# Altium PCB EMG_Arm_ELCT-V3.0.PcbDoc (part 3 of 3)
Units mil, origin at the board's own origin, x right, y up, seen from the top; angles counter-clockwise.
Board outline 8303.83 x 7532.25 mil, 2 copper layers (Top Layer, Bottom Layer), stack 3.556 mil thick; 104 components, 76 nets, 393 pads, 162 vias.
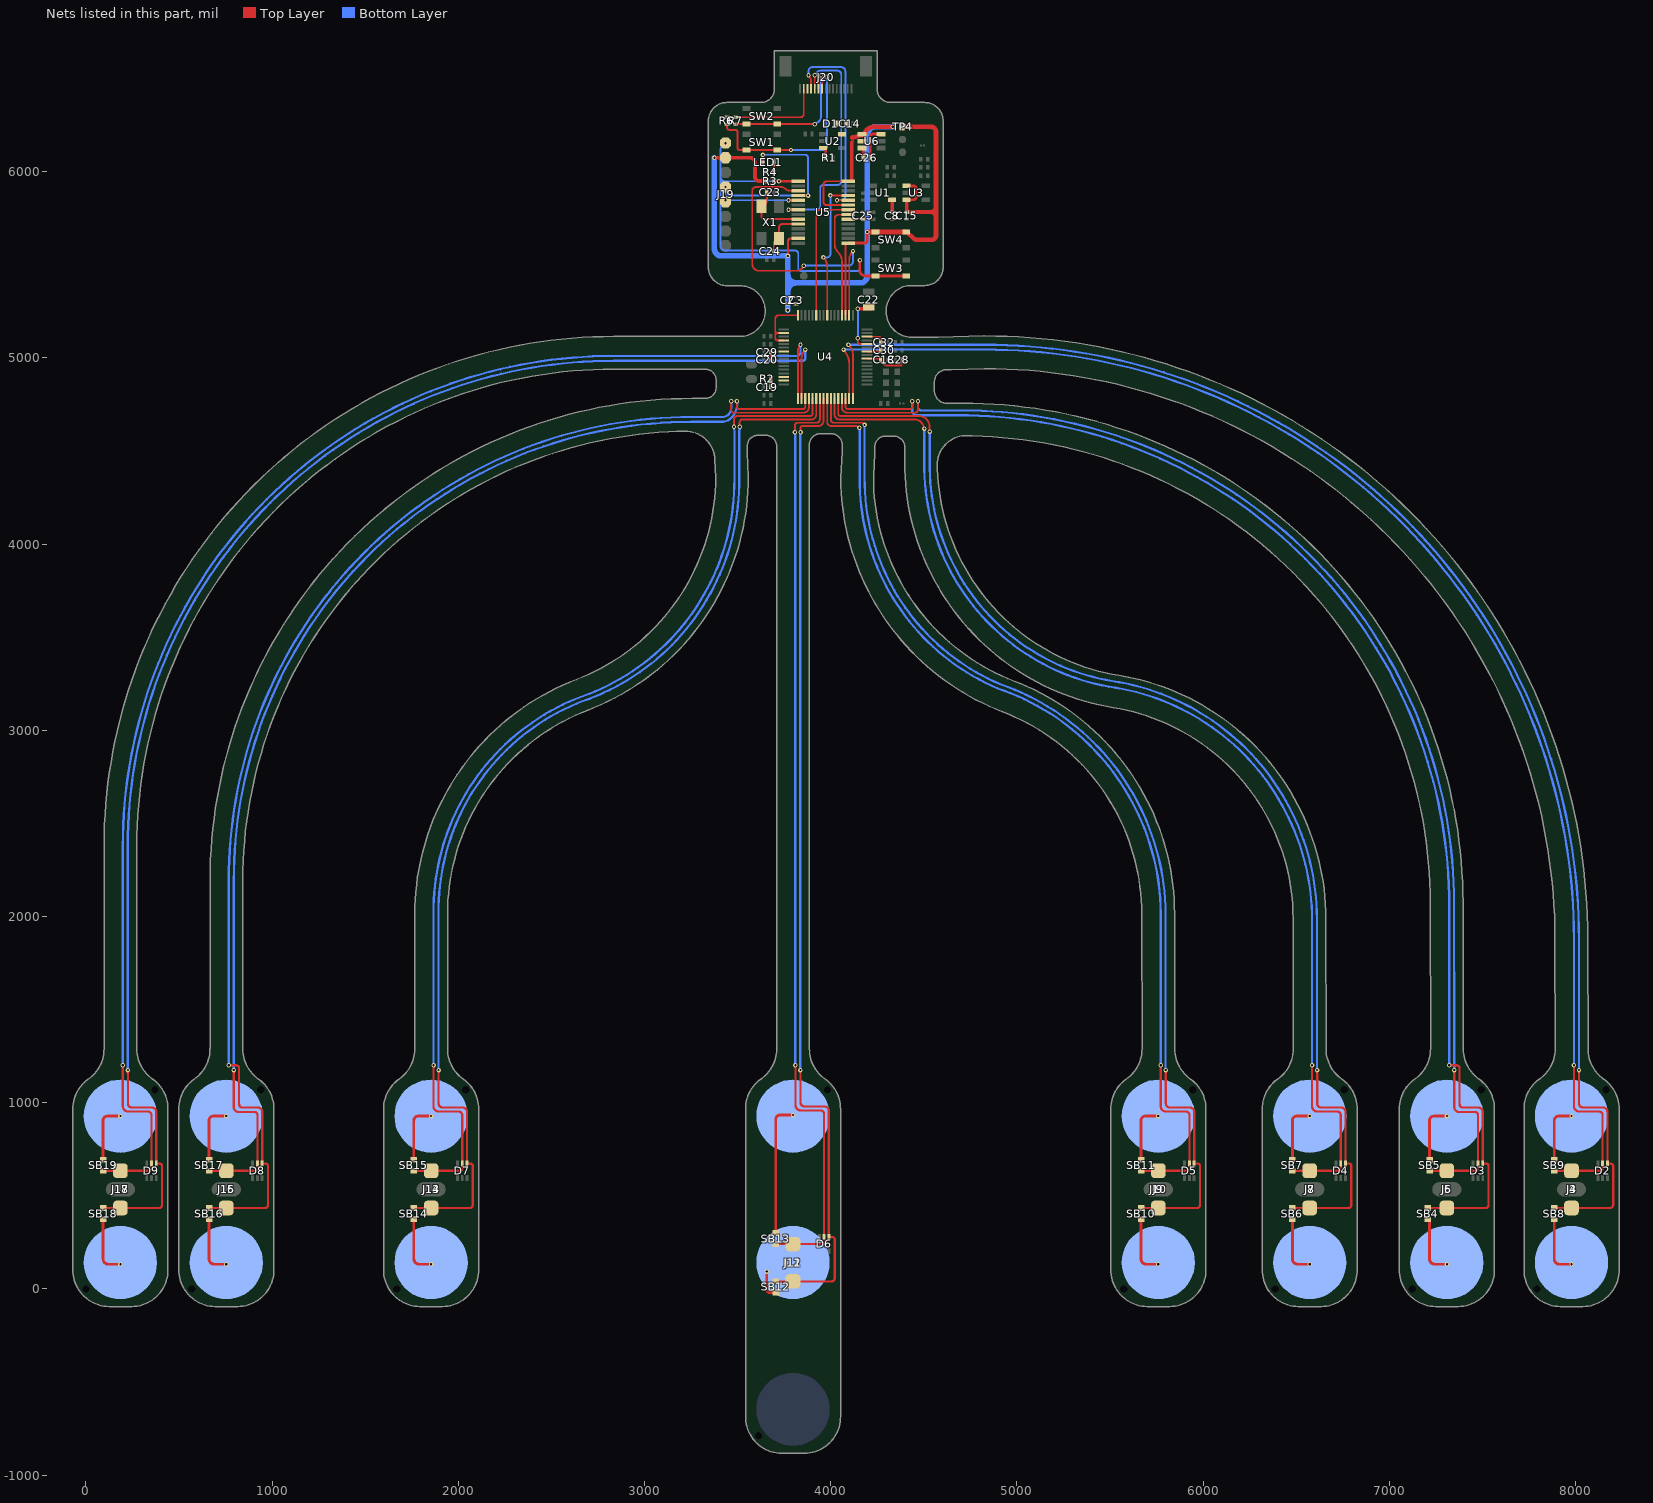
[diagram p2: the nets of this part, all layers, seen from the top]

## Via types
v1: diameter 23.62, hole 11.81, Top Layer to Bottom Layer, tented both sides, 162 vias

## Nets (pads, with @x,y where several pads share a name; then routed paths per layer and width w, separated by ;. In a path a pad name is that pad's centre, name@x,y a point inside that pad or via, vN(x,y) a via of type N, cw(c..) or ccw(c..) an arc to the next point about the centre after c; other vN are vias at no path point) (continued)
DVDD: C2.2 C3.2 C14.1 C15.1 J19.2 R3.2 SW4.1 SW4.2 TP4.1 U2.5 U3.1 U3.3 U4.35 U4.48 U4.50 U4.52 U5.13 U5.15 U5.23 U5.28 U6.4 U6.5 | length 6545.7
  Top Layer w10: U4.52@3748.03,5094.44 3713.2,5094.44 cw(c3713.2,5105.38) 3702.26,5105.38 3702.26,5122.85 ; U4.50@3748.03,5133.81 3713.22,5133.81 ; U4.48@3823.62,5229.08 3719.1,5229.08 ccw(c3719.1,5212.25) 3702.26,5212.25 3702.26,5144.77 ; U4.35@4079.2,5229.41 4079.2,5612.85 4083.06,5616.71 U5.15@4094.24,5616.71 ; U5.23@4094.24,5821.44 3977.11,5821.44 cw(c3977.11,5838.17) 3960.38,5838.17 3960.38,5929.41 cw(c3980.36,5929.41) 3980.36,5949.39 U5.28@4094.24,5949.39 U5.28@4113.38,5953.25 ; 4113.38,6157.85 4120.76,6165.05 ; 4182.47,5616.71 ccw(c4182.47,5630.62) 4185.19,5616.98 ; 3702.26,5122.85 cw(c3713.22,5122.85) 3713.22,5133.81 ; 3702.26,5122.85 3702.26,5144.77 ; 3702.26,5144.77 ccw(c3713.22,5144.77) 3713.22,5133.81
  Top Layer w12: v1@3769.52,5558.23 3770.49,5559.2 3770.49,5627.22 cw(c3785.57,5627.22) 3785.57,5642.3 U5.13@3826.52,5642.3
  Top Layer w15: U5.15@4094.24,5616.71 4182.47,5616.71 ; 4185.19,5616.98 ccw(c4182.47,5630.62) 4196.38,5630.57 ; 4196.38,5630.62 v1(4196.38,5676.34) ; U3.3@4407.71,5849.38 4441.77,5849.38 ccw(c4441.77,5866.9) 4459.29,5866.9 4459.29,5907.34 ccw(c4442.43,5907.34) 4442.43,5924.19 U3.1@4407.71,5924.19
  Top Layer w20: v1(3375.38,6075.53) J19.2@3435.38,6075.53 3566.42,6075.53 cw(c3566.42,6048.94) 3593.01,6048.94 3593.01,5972.47 ccw(c3615.43,5972.47) 3615.43,5950.05 R3.2@3653.59,5950.05 ; U5.28@4113.38,5953.25 4113.38,6157.85 ; C15.1@4407.71,5785.56 U3.3@4407.71,5849.38 ; C15.1@4408.96,5784.04 4531.73,5784.04 ; 4565.38,5745.79 4565.38,5750.38 ccw(c4531.73,5750.38) 4531.73,5784.04 ; 4565.38,5817.7 cw(c4531.73,5817.7) 4531.73,5784.04
  Top Layer w25: 4115.41,6183.59 4115.84,6183.7 4120.77,6185 4125.06,6186.13 4168.66,6197.63 4178.91,6200.34 cw(c4235.2,6183.59) 4235.2,6242.31 v1(4332.48,6242.31) ; v1(4196.38,5676.34) SW4.1@4240.11,5676.34 SW4.2@4405.47,5676.34 4409.62,5675.07 4447.37,5640.61 ccw(c4464.41,5659.38) 4464.41,5634.02 4467.19,5634.02 4541.13,5634.02 ccw(c4541.13,5658.27) 4565.38,5658.27 4565.38,5745.79 ; TP4.1@4385.38,6242.31 4536.12,6242.31 cw(c4536.12,6213.05) 4565.38,6213.05 4565.38,5750.38
  Bottom Layer w30: v1(3375.38,6075.53) 3375.38,5585.62 ccw(c3412.77,5585.62) 3412.77,5548.23 v1(3769.52,5548.23) ; v1@3769.81,5256.45 3769.81,5359.25 ; v1@3769.81,5548.23 3769.81,5446.85 ; v1(4332.48,6242.31) 4332.48,6242.21 4242.77,6242.21 ccw(c4242.77,6195.83) 4196.38,6195.83 v1(4196.38,5676.34) 4196.38,5441.74 cw(c4157.69,5441.74) 4157.69,5403.05 3813.61,5403.05 ; 3769.81,5359.25 cw(c3813.61,5359.25) 3813.61,5403.05 ; 3769.81,5359.25 3769.81,5446.85 ; 3769.81,5446.85 ccw(c3813.61,5446.85) 3813.61,5403.05
  other v1: 3769.38,5256.02
IN1N: D2.2 J3.3 SB9.2 U4.15 | length 7642.4
  Top Layer w10: v1@4070.32,5039.01 v1(4069.04,5044.74) 4083.09,5023.3 cw(c4000.55,4969.24) 4099.21,4969.24 U4.15@4099.21,4782.63
  Top Layer w12: SB9.2@7885.38,635 J3.3@7978.35,635 8131.63,635 ccw(c8131.63,648.75) 8145.38,648.75 D2.2@8145.38,673.19 8145.38,933.05 ccw(c8125.38,933.05) 8125.38,953.05 8019.38,953.05 cw(c8019.38,981) 7991.43,981 v1(7991.43,1201.19)
  Bottom Layer w12: v1@4069.04,5044.94 4825.14,5044.94 cw(c4827.28,1880.79) 7991.43,1882.94 v1(7991.43,1201.19) v1@7991.43,1195.89
IN1P: D2.1 J3.1 SB8.2 U4.16 | length 7960.8
  Top Layer w10: v1@4099.32,5065.69 v1(4094.73,5070.74) 4101.14,5063.8 cw(c4052.06,5018.43) 4118.9,5018.43 U4.16@4118.9,4782.63
  Top Layer w12: SB8.2@7885.38,435 J3.1@7978.35,435 8185.83,435 ccw(c8185.83,451.26) 8202.09,451.26 8202.09,660.77 ccw(c8189.68,660.77) 8189.68,673.19 D2.1@8170.97,673.19 8170.97,951.12 ccw(c8147.82,951.12) 8147.82,974.27 8039.99,974.27 cw(c8039.99,995.75) 8018.51,995.75 8018.51,1155.71 8018.38,1155.71 v1(8018.38,1175.36)
  Bottom Layer w12: v1@4094.73,5070.94 4825.14,5070.94 cw(c4827.08,1879.64) 8018.38,1881.58 v1(8018.38,1175.36)
IN2N: D3.2 J5.3 SB5.2 U4.13 | length 6757.9
  Top Layer w10: U4.13@4059.84,4782.63 4059.84,4735.24 ccw(c4089.18,4735.24) 4089.18,4705.9 4451.24,4705.9 ccw(c4451.24,4723) 4468.34,4723 v1(4468.34,4767.05)
  Top Layer w12: SB5.2@7215.9,635 7462.16,635 ccw(c7462.16,648.75) 7475.91,648.75 7475.91,934.57 ccw(c7460.09,934.57) 7460.09,950.38 7374.7,950.38 cw(c7374.7,976.17) 7348.91,976.17 v1(7348.91,1175.36)
  Bottom Layer w12: v1(4468.34,4767.05) 4468.34,4733.19 4471.08,4725.48 4476.61,4719.94 ccw(c4483.08,4733.19) 4483.08,4718.45 4697.61,4718.45 cw(c4699.81,2070.74) 7347.52,2072.94 7348.18,1336.76 7348.18,1177.12 ccw(c7350.66,1177.12) v1(7348.91,1175.36)
IN2P: D3.1 J5.1 SB4.2 U4.14 | length 7011.9
  Top Layer w10: U4.14@4079.53,4782.63 4079.53,4738.31 ccw(c4092.39,4738.31) 4092.39,4725.45 4426.16,4725.45 ccw(c4426.16,4737.05) 4437.76,4737.05 v1@4437.76,4767.05
  Top Layer w12: SB4.2@7215.91,435 7516.35,435 ccw(c7516.35,451.26) 7532.62,451.26 7532.62,660.77 ccw(c7520.2,660.77) 7520.2,673.19 D3.1@7501.5,673.19 7501.5,951.12 ccw(c7478.34,951.12) 7478.34,974.27 7395.67,974.27 cw(c7395.67,992.56) 7377.38,992.56 7377.38,1185.05 ccw(c7361.24,1185.05) 7361.24,1201.19 v1(7321.96,1201.19)
  Bottom Layer w12: v1(4437.71,4767.05) 4437.71,4716.09 ccw(c4461.35,4716.09) 4461.35,4692.45 4684.04,4692.45 4684.58,4692.45 cw(c4686.51,2057.02) 7321.93,2059.36 v1@7321.93,1201.22
IN3N: D4.2 J7.3 SB7.2 U4.11 | length 6034.7
  Top Layer w10: U4.11@4020.47,4782.63 4020.47,4696.32 ccw(c4047.14,4696.32) 4047.14,4669.66 4450.56,4669.66 cw(c4450.56,4620.56) 4496.78,4637.13 v1(4502.71,4620.56)
  Top Layer w12: SB7.2@6479.16,634.99 6725.41,634.99 ccw(c6725.41,648.74) 6739.16,648.74 6739.16,933.04 ccw(c6719.16,933.04) 6719.16,953.04 6613.16,953.04 cw(c6613.16,981) 6585.21,981 v1(6585.21,1201.18)
  Bottom Layer w12: 4502.71,4437.86 ccw(c5706.43,4419.62) 5492.76,3234.88 cw(c5323.01,1987.11) 6271.82,2815.05 cw(c5314.86,1980) 6584.93,1979.18 6584.93,1201.46 v1(6585.21,1201.18) ; 4502.71,4437.86 v1(4502.71,4620.56)
IN3P: D4.1 J7.1 SB6.2 U4.12 | length 6327.3
  Top Layer w10: U4.12@4040.16,4782.63 4040.16,4701.22 ccw(c4053.09,4701.22) 4047.83,4689.41 ccw(c4053.09,4701.22) 4053.09,4688.29 4472.55,4688.29 cw(c4472.55,4629.62) 4531.22,4629.62 v1(4531.22,4604.56)
  Top Layer w12: SB6.2@6479.16,434.99 6779.6,434.99 ccw(c6779.6,451.26) 6795.87,451.26 6795.87,660.77 ccw(c6783.45,660.77) 6783.45,673.18 D4.1@6764.75,673.18 6764.75,951.11 ccw(c6741.59,951.11) 6741.59,974.27 6633.76,974.27 cw(c6633.76,995.75) 6612.28,995.75 6612.28,1155.71 6612.16,1155.71 v1(6612.16,1175.36)
  Bottom Layer w12: v1(4531.22,4604.56) 4531.22,4442.9 4531.2,4441.17 ccw(c5713.01,4425.65) 4805.87,3668 ccw(c5700.51,4415.2) 5510.86,3265.1 5510.95,3265.09 cw(c5317.55,1986.08) 6611.09,1988.33 6611.26,1339.69 6611.26,1177.52 ccw(c6614.32,1177.52) v1(6612.16,1175.36)
IN4N: D5.2 J9.3 SB11.2 U4.9 | length 5378.4
  Top Layer w10: U4.9@3981.1,4782.63 3981.1,4655.76 ccw(c4002.22,4655.76) 4002.22,4634.65 4135.97,4634.65 cw(c4135.97,4625.56) 4140.37,4633.51 v1(4154.13,4625.56)
  Top Layer w12: SB11.2@5666.45,635 J9.3@5759.41,635 5912.69,635 ccw(c5912.69,648.75) 5926.45,648.75 D5.2@5926.45,673.19 5926.45,933.05 ccw(c5906.45,933.05) 5906.45,953.05 5800.45,953.05 cw(c5800.45,981) 5772.5,981 v1(5772.5,1201.19)
  Bottom Layer w12: v1@4155.3,4625.56 4155.3,4353.38 ccw(c5373.93,4346.65) 4895.83,3225.7 cw(c4484.74,2005.3) 5772.43,2019.89 5772.43,1201.25 v1(5772.5,1201.19)
IN4P: D5.1 J9.1 SB10.2 U4.10 | length 5671
  Top Layer w10: U4.10@4000.79,4782.63 4000.79,4667.33 ccw(c4016.26,4667.33) 4016.26,4651.86 4167.08,4651.86 cw(c4167.08,4640.56) 4174.36,4649.21 4182.91,4642.1 v1@4184.75,4640.56
  Top Layer w12: SB10.2@5666.45,435 J9.1@5759.41,435 5966.89,435 ccw(c5966.89,451.26) 5983.16,451.26 5983.16,660.77 ccw(c5970.74,660.77) 5970.74,673.19 D5.1@5952.04,673.19 5952.04,951.12 ccw(c5928.88,951.12) 5928.88,974.27 5821.05,974.27 cw(c5821.05,995.75) 5799.57,995.75 5799.57,1155.71 5799.45,1155.71 v1(5799.45,1175.36)
  Bottom Layer w12: v1(4181.64,4640.56) 4181.64,4354.86 ccw(c5377.34,4348.61) 4914.27,3246.2 cw(c4482.4,2003.02) 5798.38,2017.44 5798.38,1177.93 ccw(c5802.01,1177.93) v1(5799.45,1175.36)
IN5N: D6.2 J11.3 SB13.2 U4.7 | length 5134.1
  Top Layer w10: v1(3807.38,4601.05) 3807.38,4637.62 cw(c3821.62,4637.62) 3821.62,4651.86 3924.15,4651.86 ccw(c3924.15,4669.45) 3941.73,4669.45 U4.7@3941.73,4782.63
  Top Layer w12: SB13.2@3704.28,240.8 J11.3@3797.24,240.8 3950.53,240.8 ccw(c3950.53,254.55) 3964.28,254.55 3964.28,938.85 ccw(c3944.28,938.85) 3944.28,958.85 3838.28,958.85 cw(c3838.28,986.8) 3810.33,986.8 v1(3810.33,1201.19)
  Bottom Layer w12: v1(3807.38,4601.05) cw(c3807.38,4598.83) 3809.6,4598.83 3809.6,4561.31 3809.93,1355.05 ; 3809.93,1437.83 3809.93,1355.05 ; v1(3810.33,1201.19) cw(c3811.29,1202.15) 3809.93,1202.15 3809.93,1355.05
IN5P: D6.1 J11.1 SB12.2 U4.8 | length 5402
  Top Layer w10: v1@3838,4601.05 3837.38,4601.05 3837.38,4623.05 cw(c3848.98,4623.05) 3848.98,4634.65 3932.59,4634.65 ccw(c3932.59,4663.48) 3961.42,4663.48 U4.8@3961.42,4782.63
  Top Layer w12: SB12.2@3704.28,40.8 J11.1@3797.24,40.8 4004.72,40.8 ccw(c4004.72,57.06) 4020.99,57.06 4020.99,266.57 ccw(c4008.57,266.57) 4008.57,278.98 3989.87,278.98 3989.87,956.91 ccw(c3966.71,956.91) 3966.71,980.07 3858.88,980.07 cw(c3858.88,1001.55) 3837.4,1001.55 v1@3837.4,1175.37
  Bottom Layer w12: 3836.55,1419.54 3836.55,1336.76 ; v1(3837.28,1175.37) cw(c3839.04,1177.12) 3836.55,1177.12 3836.55,1336.76 ; v1@3838,4601.05 ccw(c3838,4599.26) 3836.22,4599.26 3836.22,4561.31 3836.55,1336.76
  other v1: 3838,4600.56
IN6N: D7.2 J13.3 SB15.2 U4.5 | length 5636.1
  Top Layer w10: v1(3480.18,4630.56) 3480.19,4662.37 3480.19,4670.42 cw(c3498.06,4670.42) 3498.06,4688.29 3889.44,4688.29 ccw(c3889.44,4701.22) 3894.7,4689.41 ccw(c3889.44,4701.22) 3902.36,4701.22 U4.5@3902.36,4782.63
  Top Layer w12: SB15.2@1760.8,635 J13.3@1853.76,635 2007.05,635 ccw(c2007.05,648.75) 2020.8,648.75 D7.2@2020.8,673.19 2020.8,933.05 ccw(c2000.8,933.05) 2000.8,953.05 1894.8,953.05 cw(c1894.8,981) 1866.85,981 v1(1866.85,1201.19)
  Bottom Layer w12: v1(1866.85,1201.19) 1866.91,1201.25 1866.91,2014.97 cw(c3097,2030.82) 2700.07,3195.22 ccw(c2251.82,4341.31) 3482.43,4348.62 3482.43,4594.75 ccw(c3470.43,4594.75) 3482.4,4595.5 v1(3480.18,4630.56)
IN6P: D7.1 J13.1 SB14.2 U4.6 | length 5902.2
  Top Layer w10: v1(3510.8,4630.59) 3510.76,4654.02 cw(c3526.39,4654.04) 3526.39,4669.66 3895.39,4669.66 ccw(c3895.39,4696.32) 3922.05,4696.32 U4.6@3922.05,4782.63
  Top Layer w12: SB14.2@1760.8,435 J13.1@1853.76,435 2061.24,435 ccw(c2061.24,451.26) 2077.51,451.26 2077.51,660.77 ccw(c2065.09,660.77) 2065.09,673.19 D7.1@2046.39,673.19 2046.39,951.12 ccw(c2023.23,951.12) 2023.23,974.27 1915.4,974.27 cw(c1915.4,995.75) 1893.92,995.75 1893.92,1155.71 1893.8,1155.71 v1(1893.8,1175.36)
  Bottom Layer w12: v1(1893.8,1175.36) cw(c1895.55,1177.12) 1893.07,1177.12 1893.07,1336.76 1893.82,2015.83 cw(c3098.17,2031.47) 2705.5,3170.11 ; 2705.5,3170.11 ccw(c2257.62,4337.95) 3508.28,4354.96 3508.28,4594.78 cw(c3520.28,4594.78) 3508.31,4595.63 v1(3510.8,4630.59)
IN7N: D8.2 J15.3 SB17.2 U4.3 | length 6560
  Top Layer w10: v1(3495.81,4767.05) 3495.81,4738.52 ccw(c3508.89,4738.52) 3508.89,4725.45 3850.13,4725.45 ccw(c3850.13,4738.31) 3862.99,4738.31 U4.3@3862.99,4782.63
  Top Layer w12: SB17.2@661.01,635 907.26,635 ccw(c907.26,648.75) 921.01,648.75 921.01,934.57 ccw(c905.2,934.57) 905.2,950.38 819.8,950.38 cw(c819.8,976.17) 794.01,976.17 v1(794.01,1175.36)
  Bottom Layer w12: v1(794.01,1175.36) cw(c795.77,1177.12) 793.28,1177.12 793.28,1336.76 793.91,2195.32 cw(c3252.32,2198.53) 3249.14,4656.94 3412.93,4656.94 ccw(c3413.08,4732.54) 3470.98,4683.92 ccw(c3382.98,4757.79) 3497.84,4760.44 ccw(c3485.85,4760.13) 3496.63,4765.39 v1(3495.81,4767.05)
IN7P: D8.1 J15.1 SB16.2 U4.4 | length 6969.6
  Top Layer w10: v1(3465.19,4767.05) 3465.19,4722 ccw(c3481.29,4722) 3481.29,4705.9 3853.34,4705.9 ccw(c3853.34,4735.24) 3882.68,4735.24 U4.4@3882.68,4782.63
  Top Layer w12: SB16.2@661.01,435 961.46,435 ccw(c961.46,451.26) 977.72,451.26 977.72,660.77 ccw(c965.31,660.77) 965.31,673.19 D8.1@946.6,673.19 946.6,951.12 ccw(c923.45,951.12) 923.45,974.27 840.77,974.27 cw(c840.77,992.56) 822.49,992.56 822.49,1185.05 ccw(c806.35,1185.05) 806.35,1201.19 v1(767.06,1201.19)
  Bottom Layer w12: v1(767.06,1201.19) 766.91,1201.35 766.91,2194.35 cw(c3252.81,2197.03) 3250.14,4682.94 3418.57,4682.94 ccw(c3418.57,4729.56) 3465.19,4729.56 v1(3465.19,4767.05)
IN8N: D9.2 J17.3 SB19.2 U4.1 | length 7616.3
  Top Layer w10: U4.1@3823.62,4782.63 3823.62,5036.52 cw(c3872.01,5036.52) v1(3837.8,5070.74)
  Top Layer w12: SB19.2@92.03,635 338.29,635 ccw(c338.29,648.75) 352.04,648.75 352.04,933.05 ccw(c332.04,933.05) 332.04,953.05 226.04,953.05 cw(c226.04,981) 198.09,981 v1(198.09,1201.19)
  Bottom Layer w12: v1(198.09,1201.19) 197.93,1201.35 197.93,2378.94 cw(c2832.03,2376.83) 2834.14,5010.94 3818.27,5010.94 ccw(c3818.27,5030.05) 3837.38,5030.05 3837.38,5070.74 v1(3837.8,5070.74)
IN8P: D9.1 J17.1 SB18.2 U4.2 | length 7859.9
  Top Layer w10: U4.2@3843.31,4782.63 3843.31,4996.04 cw(c3912.18,4996.04) v1(3863.48,5044.74)
  Top Layer w12: SB18.2@92.03,435 392.48,435 ccw(c392.48,451.26) 408.75,451.26 408.75,660.77 ccw(c396.33,660.77) 396.33,673.19 D9.1@377.63,673.19 377.63,951.12 ccw(c354.47,951.12) 354.47,974.27 246.64,974.27 cw(c246.64,995.75) 225.16,995.75 225.16,1155.71 225.04,1155.71 v1(225.04,1175.36)
  Bottom Layer w12: v1(225.04,1175.36) cw(c226.79,1177.12) 224.31,1177.12 224.31,2379.72 cw(c2831.83,2377.41) 2834.14,4984.94 3848.27,4984.94 ccw(c3848.27,5000.15) 3863.48,5000.15 v1(3863.48,5044.74)
MCLR: J19.1 R3.1 SW3.3 SW3.4 U5.1 | length 2306.6
  Top Layer w15: R3.1@3698.21,5949.39 v1(3721.64,5949.39) U5.1@3826.52,5949.39 ; v1(4156.35,5525.08) ccw(c4156.35,5524.11) 4155.38,5524.11 4155.38,5473.05 ccw(c4187.7,5473.05) 4187.7,5440.73 SW3.3@4240.5,5440.73 SW3.4@4405.86,5440.73
  Bottom Layer w10: 3410.1,5949.39 v1@3721.93,5949.39 ; v1(3435.38,6153.05) 3417.48,6137.72 ccw(c3435.38,6116.82) 3407.87,6116.82 3407.87,5972.62 ; v1(4156.35,5525.08) 4156.35,5482.32 cw(c4141.88,5482.32) 4141.88,5467.84 3838.92,5467.84 cw(c3838.92,5481.38) 3825.38,5481.38 3825.38,5558.05 ccw(c3805.38,5558.05) 3805.38,5578.05 3429.84,5578.05 cw(c3429.84,5600.02) 3407.87,5600.02 3407.87,5926.15 ; 3407.87,5926.15 cw(c3431.1,5926.15) 3431.1,5949.39 cw(c3431.1,5972.62) 3407.87,5972.62 ; 3407.87,5926.15 3407.87,5949.39 3407.87,5972.62
MISO: U4.43 U5.22 | length 730.5
  Top Layer w10: U4.43@3922.05,5229.08 3922.05,5775.5 cw(c3942.6,5775.5) 3942.6,5796.05 4094.24,5796.05 U5.22@4094.24,5795.85
MOSI: U4.34 U5.3 | length 1650.4
  Top Layer w10: 3819.47,5468.09 3616.51,5468.09 cw(c3616.51,5506.22) 3578.38,5506.22 3578.38,5898.05 cw(c3598.38,5898.05) 3598.38,5918.05 3732.71,5918.05 cw(c3732.71,5884.18) 3756.64,5908.15 ccw(c3780.61,5932.08) 3780.61,5898.21 U5.3@3826.52,5898.21 ; 3819.52,5468.09 ccw(c3819.52,5499.58) 3845.75,5482.15 v1(3854.73,5495.67) ; U4.34@4099.21,5229.08 4099.21,5525.08 cw(c4168.44,5525.08) v1(4119.49,5574.02)
  Bottom Layer w10: v1(3854.73,5495.67) 4096.34,5495.67 ccw(c4096.34,5518.82) 4119.49,5518.82 v1(4119.49,5574.02)
NetC8_1: C8.1 U1.4 | length 63.9
  Top Layer w20: C8.1@4330.09,5785.52 U1.4@4330.09,5849.38
NetC18_1: C18.1 C28.2 U4.24 | length 227.7
  Top Layer w10: U4.24@4194.63,4996.15 C18.1@4268.38,4996.15 ; C18.1@4268.38,4989.15 4272.38,4981.65 4281.63,4970.19 ccw(c4305.13,4989.15) 4305.13,4958.96 4372.85,4958.96 ccw(c4372.85,4968.82) 4379.02,4961.12 4380.54,4962.65 ccw(c4372.85,4968.82) 4382.71,4968.82 C28.2@4382.71,4989.38
NetC19_2: C19.2 R2.2 U4.62 U4.63 | length 44.9
  Top Layer w15: C19.2@3678.7,4843.9 R2.2@3678.71,4888.78
NetC20_2: C20.2 C29.2 U4.55 | length 44.9
  Top Layer w12: C20.2@3678.71,4984.5 C29.2@3678.71,5029.38
NetC22_2: C22.2 U4.28 | length 307.3
  Top Layer w10: v1(4145.43,5105.4) 4145.2,5105.4 4145.2,5086.74 ccw(c4157.2,5086.74) 4157.2,5074.75 U4.28@4194.49,5074.75
  Top Layer w20: v1(4145.43,5264.21) C22.2@4218.92,5264.21
  Bottom Layer w10: v1(4145.43,5105.4) v1(4145.43,5264.21)
NetC23_2: C23.2 U5.9 X1.1 | length 355
  Top Layer w10: C23.2@3656.88,5889.35 3656.88,5843.28 cw(c3628.14,5843.28) X1.1@3628.14,5814.54 3628.14,5762.18 ccw(c3644.76,5762.18) 3644.76,5745.57 U5.9@3830.14,5745.57
NetC24_2: C24.2 U5.10 X1.3 | length 259.4
  Top Layer w10: C24.2@3693.88,5573.05 3693.88,5612.58 cw(c3722.62,5612.58) X1.3@3722.62,5641.32 3722.62,5702.86 cw(c3738.84,5702.86) 3738.84,5719.07 U5.10@3826.52,5719.07
NetC25_2: C25.2 U5.20 | length 81.7
  Top Layer w10: U5.20@4094.24,5744.66 4174.43,5744.66 ccw(c4174.43,5745.61) C25.2@4175.38,5745.61
NetC26_1: C26.1 U6.3 | length 169.2
  Top Layer w15: C26.1@4211.97,6079.61 4211.97,6190.25 cw(c4224.17,6190.25) 4224.17,6202.45 U6.3@4263.54,6202.45
NetC26_2: C26.2 U6.6 | length 47.7
  Top Layer w15: U6.6@4167.39,6127.65 U6.6@4174.26,6127.65 ; C26.2@4174.47,6079.61 U6.6@4174.47,6120.45
NetC30_2: C30.2 U4.26 | length 73.9
  Top Layer w10: U4.26@4194.49,5035.38 C30.2@4268.39,5035.38
NetC32_2: C32.2 U4.30 | length 99.7
  Top Layer w10: U4.30@4194.49,5114.12 4256.98,5114.12 cw(c4256.98,5102.71) 4268.39,5102.71 C32.2@4268.39,5083.4
NetJ4_1: J4.1 SB9.1 | length 316.2
  Top Layer w15: SB9.1@7885.38,695 7885.38,905.06 cw(c7908.52,905.06) 7908.52,928.2 v1(7978.34,928.2)
NetJ4_2: J4.2 SB8.1 | length 322.8
  Top Layer w15: SB8.1@7885.38,375 7885.38,161.21 ccw(c7913.55,161.21) 7913.55,133.05 v1(7978.35,133.05)
NetJ6_1: J6.1 SB5.1 | length 316.2
  Top Layer w15: SB5.1@7215.9,695 7215.91,905.06 cw(c7239.05,905.06) 7239.05,928.2 v1(7308.87,928.2)
NetJ6_2: J6.2 SB4.1 | length 322.8
  Top Layer w15: SB4.1@7215.91,375 7215.91,161.22 ccw(c7244.07,161.22) 7244.07,133.05 v1(7308.87,133.05)
NetJ8_1: J8.1 SB7.1 | length 316.2
  Top Layer w15: SB7.1@6479.16,694.99 6479.16,905.05 cw(c6502.3,905.05) 6502.3,928.19 v1(6572.12,928.19)
NetJ8_2: J8.2 SB6.1 | length 322.8
  Top Layer w15: SB6.1@6479.16,374.99 6479.16,161.21 ccw(c6507.32,161.21) 6507.32,133.04 v1(6572.12,133.04)
NetJ10_1: J10.1 SB11.1 | length 316.2
  Top Layer w15: SB11.1@5666.45,695 5666.45,905.06 cw(c5689.58,905.06) 5689.58,928.2 v1(5759.41,928.2)
NetJ10_2: J10.2 SB10.1 | length 322.8
  Top Layer w15: SB10.1@5666.45,375 5666.45,161.21 ccw(c5694.61,161.21) 5694.61,133.05 v1(5759.41,133.05)
NetJ12_1: J12.1 SB13.1 | length 716.2
  Top Layer w15: SB13.1@3704.28,300.8 3704.28,910.85 cw(c3727.42,910.85) 3727.42,933.99 v1(3797.24,933.99)
NetJ12_2: J12.2 SB12.1 | length 153.4
  Top Layer w15: v1(3656.36,93.05) 3656.36,-3.43 ccw(c3672.13,-3.43) 3672.13,-19.2 SB12.1@3704.28,-19.2
NetJ14_1: J14.1 SB15.1 | length 316.2
  Top Layer w15: SB15.1@1760.8,695 1760.8,905.06 cw(c1783.94,905.06) 1783.94,928.2 v1(1853.76,928.2)
NetJ14_2: J14.2 SB14.1 | length 322.8
  Top Layer w15: SB14.1@1760.8,375 1760.8,161.21 ccw(c1788.96,161.21) 1788.96,133.05 v1(1853.76,133.05)
NetJ16_1: J16.1 SB17.1 | length 316.2
  Top Layer w15: SB17.1@661.01,695 661.01,905.06 cw(c684.15,905.06) 684.15,928.2 v1(753.98,928.2)
NetJ16_2: J16.2 SB16.1 | length 322.8
  Top Layer w15: SB16.1@661.01,375 661.01,161.21 ccw(c689.18,161.21) 689.18,133.05 v1(753.98,133.05)
NetJ18_1: J18.1 SB19.1 | length 316.2
  Top Layer w15: SB19.1@92.03,695 92.04,905.06 cw(c115.18,905.06) 115.18,928.2 v1(185,928.2)
NetJ18_2: J18.2 SB18.1 | length 322.8
  Top Layer w15: SB18.1@92.03,375 92.04,161.21 ccw(c120.2,161.21) 120.2,133.05 v1(185,133.05)
NetLED1_2: LED1.2 R4.2 | length 55.1
  Top Layer w16: R4.2@3693.88,5996.68 LED1.2@3693.88,6051.79
NetR1_2: R1.2 U2.3 | length 57.9
  Top Layer w15: U2.3@3958.7,6127.71 3965.58,6127.71 3972.78,6120.5 R1.2@3972.78,6079.67
PGC: J19.5 U5.5 | length 391.1
  Top Layer w15: v1@3773.38,5847.03 U5.5@3826.52,5847.03
  Bottom Layer w10: v1(3435.38,5847.23) v1(3773.38,5847.23)
PGD: J19.4 LED1.1 U5.4 | length 1032.9
  Top Layer w15: LED1.1@3634.83,6066.79 LED1.1@3635.1,6067.07 ; LED1.1@3635.1,6052.07 v1@3635.1,6090.25 ; U5.4@3820.38,5873.05 3821.06,5872.37 3878.33,5872.37 v1(3878.57,5872.13)
  Bottom Layer w10: v1(3435.38,5918.25) 3435.99,5918.25 3435.99,5888.05 ccw(c3451.91,5888.05) 3451.91,5872.13 3773.38,5872.13 v1(3878.57,5872.13) 3878.57,6073.09 ccw(c3860.16,6073.09) 3860.16,6091.51 v1@3636.83,6091.51
  other v1: 3635.38,6090.53
RESET: U4.36 U5.21 | length 615.1
  Top Layer w10: U4.36@4059.84,5229.08 4059.84,5518.87 ccw(c3992.64,5518.87) 4040.16,5566.39 cw(c4085.52,5611.76) 4021.37,5611.76 4021.37,5748.75 cw(c4041.67,5748.75) 4041.67,5769.05 4093.04,5769.05 ccw(c4093.04,5770.25) U5.21@4094.24,5770.25
RXD: J20.4 U5.24 | length 1110.4
  Top Layer w10: v1(3880.61,6518.2) cw(c3847.08,6484.66) 3894.5,6484.66 J20.4@3894.5,6445.36 ; v1(4033.54,5847.03) U5.24@4094.24,5847.03
  Bottom Layer w10: v1(3880.61,6518.2) 3880.61,6540.58 cw(c3902.09,6540.58) 3902.09,6562.05 4055.61,6562.05 cw(c4055.61,6539.27) 4078.39,6539.27 4078.39,5868.81 cw(c4056.61,5868.81) 4056.61,5847.03 v1(4033.54,5847.03)
SCLK: U4.40 U5.25 | length 775.7
  Top Layer w10: v1(3960.38,5540.3) 3960.38,5539.79 cw(c3910.35,5489.76) 3981.1,5489.79 U4.40@3981.1,5229.08 ; v1(3998.38,5873.05) ccw(c3999.43,5874.1) 3999.43,5872.62 U5.25@4094.24,5872.62
  Bottom Layer w10: v1(3960.38,5540.3) 3970.84,5539.79 3979.12,5539.79 ccw(c3979.12,5559.05) 3998.38,5559.05 v1(3998.38,5873.05)
SW1: J20.7 R6.1 SW1.1 SW1.2 | length 1123.3
  Top Layer w10: R6.1@3442.67,6256.02 3442.67,6237.78 ccw(c3455.45,6237.78) 3455.45,6225 3487.13,6225 cw(c3487.13,6212.77) 3499.36,6212.77 3499.36,6128.52 ccw(c3510.93,6128.52) 3510.93,6116.95 SW1.1@3713.06,6116.95 v1(3786.33,6116.95) ; J20.7@3953.56,6445.36 3953.56,6474.89 cw(c3978.49,6474.89) 3960.85,6492.49 ; 3960.87,6492.51 3978.49,6510.14 v1(3981.3,6510.14)
  Bottom Layer w10: v1(3786.33,6116.95) 3960.98,6116.95 ccw(c3960.98,6136.33) 3980.36,6136.33 3980.36,6509.2 cw(c3981.3,6509.2) v1(3981.3,6510.14)
SW2: J20.6 R7.1 SW2.1 SW2.2 | length 778.4
  Top Layer w10: R7.1@3490.38,6256.02 3547.7,6256.02 SW2.2@3547.7,6255.73 SW2.1@3713.06,6255.73 v1(3914.18,6255.73) ; J20.6@3933.87,6445.36 3933.87,6484.66 cw(c3981.3,6484.66) v1(3947.76,6518.2)
  Bottom Layer w10: v1(3914.18,6255.73) 3932.25,6267.27 ccw(c3914.18,6295.57) 3947.76,6295.57 v1(3947.76,6518.2)
TXD: J20.5 U5.7 | length 1276.7
  Top Layer w10: v1@3773.38,5795.85 v1(3773.38,5796.05) ; J20.5@3914.18,6445.36 v1(3914.18,6518.2)
  Top Layer w15: v1@3773.38,5795.85 U5.7@3826.52,5795.85
  Bottom Layer w10: v1(3773.38,5796.05) cw(c3774.38,5796.05) 3774.38,5797.05 3924.56,5797.05 ; v1(3914.18,6518.2) 3925.14,6532.99 cw(c3945.11,6518.2) 3945.11,6543.05 4035.38,6543.05 cw(c4035.38,6521.83) 4056.61,6521.83 4056.61,5949.39 cw(c4036.63,5949.39) 4036.63,5929.41 3960.38,5929.41 ccw(c3960.38,5912.41) 3943.38,5912.41 3943.38,5811.61 cw(c3933.38,5811.61) 3941.6,5805.9 cw(c3924.6,5817.79) 3924.6,5797.05
VBATT: D1.1 J20.3
VCC_3V3: J20.2 R6.2 R7.2 | length 557.4
  Top Layer w10: R6.2@3442.67,6293.02 R7.2@3490.38,6293.02 3837.91,6293.02 ccw(c3837.91,6310.25) 3855.13,6310.25 J20.2@3855.13,6445.36
pads on no net: D2.4 D2.5 D2.6 D3.4 D3.5 D3.6 D4.4 D4.5 D4.6 D5.4 D5.5 D5.6 D6.4 D6.5 D6.6 D7.4 D7.5 D7.6 D8.4 D8.5 D8.6 D9.4 D9.5 D9.6 J20.8 J20.9 J20.10 J20.11 J20.12 J20.13 J20.14 J20.15 U2.4 U3.4 U4.27 U4.29 U4.38 U4.42 U4.44 U4.45 U4.46 U5.14 U5.16 U5.17 U5.18

## Polygon pours and split planes (outlines as drawn)
AGND on Top Layer "AGND_L01_P012" (hatched 45Degree grid 20 track 8, remove dead copper, pour order 12): 3739,6415.83 3739,6616.62 4207.49,6616.62 4207.49,6415.83 4133.26,6415.83 4133.26,6546.43 3837.22,6546.43 3837.22,6415.83
BIAS_DRV_ELCT on Top Layer "BIAS_DRV_ELCT_L01_P002" (solid, pour order 2): 4325.39,4905.83 ccw(c4333.98,4905.87) 4334.01,4897.28 4371.58,4897.28 4371.58,4789.69 4341.58,4789.69 cw(c4341.58,4801.79) 4329.47,4801.79 4329.47,4885.13 ccw(c4320.86,4885.13) 4320.86,4893.74 4281.58,4893.74 4281.58,4942.28 4325.39,4942.28
AGND on Top Layer "AGND_L01_P009" (hatched 45Degree grid 20 track 8, remove dead copper, pour order 9): 4447.69,5710.22 cw(c4447.69,5699.01) 4458.89,5699.01 4458.89,5678.69 ccw(c4475.01,5678.69) 4475.01,5662.57 4526.6,5662.57 ccw(c4526.6,5676.34) 4540.38,5676.34 4540.38,5738.05 ccw(c4517.04,5738.05) 4517.04,5761.4 4230.91,5761.4 4196.38,5761.4 4196.38,5727.93 4057.82,5727.93 4057.82,5710.22
AGND on Top Layer "AGND_L01_P007" (hatched 45Degree grid 20 track 8, remove dead copper, pour order 7): 3484.2,6007.87 cw(c3503.12,6007.87) 3503.12,6026.79 3537.7,6026.79 cw(c3537.7,6007.11) 3557.38,6007.11 3557.38,5463.13 cw(c3537.3,5463.13) 3537.3,5443.05 3505.38,5443.05 cw(c3505.38,5464.23) 3484.2,5464.23
AVSS on Top Layer "AVSS_L01_P004" (hatched 45Degree grid 20 track 8, remove dead copper, pour order 4): 4226.75,5334.21 cw(c4226.75,5313.68) 4247.28,5313.68 4247.28,5213.72 cw(c4233.78,5213.65) 4233.84,5200.15 4165.55,5200.15 4165.55,5147.98 4256.02,5147.98 cw(c4256.02,5107.61) 4296.39,5107.6 4296.39,4976.65 4354.71,4976.65 4354.71,5108.61 ccw(c4303.45,5108.61) 4339.69,5144.86 4319.5,5165.05 cw(c4341.52,5187.07) 4310.38,5187.07 4310.38,5399.5 ccw(c4295.97,5399.5) 4295.97,5413.91 4178.35,5413.91 ccw(c4178.35,5401.11) 4165.55,5401.11 4165.55,5351.68 ccw(c4183.03,5351.68) 4183.03,5334.21
VBATT on Top Layer "VBATT_L01_P003" (hatched 45Degree grid 20 track 8, remove dead copper, pour order 3): 4039.86,6239.23 ccw(c4039.86,6250.29) 4050.92,6250.29 4050.92,6375.43 ccw(c4032.3,6375.43) 4032.3,6394.05 3889.24,6394.05 cw(c3889.24,6401.59) 3881.7,6401.59 3881.7,6474.89 3867.92,6474.89 3867.92,6327.51 ccw(c3884.38,6327.51) 3884.38,6311.05 3975.38,6311.05 cw(c3975.38,6295.05) 3991.38,6295.05 3991.38,6253.57 ccw(c4005.72,6253.57) 4005.72,6239.23
AVSS on Top Layer "AVSS_L01_P001" (hatched 45Degree grid 20 track 8, remove dead copper, pour order 1): 3776.97,5001.52 3776.97,4969.42 3784.1,4969.42 3784.1,5069.24 3748.03,5069.24 3748.03,5080.26 3784.1,5080.26 3784.1,5229.08 4118.9,5229.08 4118.9,5133.81 4158.55,5133.81 4158.55,5021.21 4321.09,5021.21 4321.09,5010.19 4158.55,5010.19 4158.55,4983.5 4223.43,4983.5 4223.43,4970.82 4158.55,4970.82 4158.55,4924.45 4223.43,4924.45 4223.43,4911.76 4131.13,4911.76 4085.04,4911.76 4085.04,4948.93 3632.71,4948.93 3632.71,5128.79 3662.71,5128.79 3662.71,5001.52
no net on Top Overlay "NONET_L01_P-001" (solid): 3670.38,-618.01 3670.38,-263.01 cw(c3770.38,-263.01) 3770.38,-163.01 3830.38,-163.01 cw(c3830.38,-263.01) 3930.38,-263.01 3930.38,-618.01 cw(c3830.38,-618.01) 3830.38,-718.01 3770.38,-718.01 cw(c3770.38,-618.01)
no net on Top Overlay "NONET_L01_P-001" (solid): 3688.08,-483.22 3688.08,-666.95 3907.13,-666.95 3906.89,-483.22 cw(c3797.49,-646.95) 3994.41,-646.95 cw(c3797.49,-646.95) 3797.49,-843.87 cw(c3797.49,-646.95) 3600.57,-646.95 cw(c3797.49,-646.95)
AGND on Bottom Layer "AGND_L02_P011" (hatched 45Degree grid 20 track 8, remove dead copper, pour order 11): 4055.61,6562.05 4060.95,6562.05 cw(c4060.95,6529) 4094,6529 4094,5879.45 ccw(c4126.42,5879.45) 4126.42,5847.03 4136.63,5847.03 ccw(c4136.63,5878.43) 4168.03,5878.43 4168.03,6214.66 cw(c4227.42,6214.66) 4227.42,6274.05 4438.38,6274.05 cw(c4438.38,6221.21) 4491.23,6221.21 4491.23,6008.61 cw(c4426.63,6008.61) 4426.63,5944.02 4365.83,5944.02 ccw(c4365.83,5898.19) 4320,5898.19 4320,5429.21 cw(c4220,5429.21) 4220,5329.21 4216.77,5329.21 4040.16,5329.21 ccw(c4040.16,5315.04) 4025.99,5315.04 4025.99,5249.63 cw(c4005.44,5249.63) 4005.43,5229.08 3995.28,5229.08 cw(c3994.38,5252.63) 3970.84,5251.74 3970.84,5354.89 ccw(c3950.89,5354.9) 3950.89,5374.85 3825.38,5374.85 ccw(c3825.38,5353.5) 3804.03,5353.5 3804.03,5261.75 cw(c3771.36,5261.75) 3771.36,5229.08 cw(c3771.36,5268.31) 3732.14,5268.31 3732.14,5481.39 3732.14,5506.13 ccw(c3706.38,5506.13) 3706.38,5531.88 3371.7,5531.88 ccw(c3371.7,5502.87) 3342.69,5502.87 3342.69,5478.78 ccw(c3433.42,5478.78) 3433.42,5388.05 3523.88,5388.05 cw(c3523.88,5327.55) 3584.38,5327.55 3584.38,5197.05 cw(c3488.07,5197.05) 3488.07,5100.74 3399.79,5100.73 ccw(c3399.79,5078.32) 3377.38,5078.32 3377.38,4972.46 ccw(c3390.22,4972.46) 3390.22,4959.62 3390.82,4959.62 cw(c3390.82,4938.77) 3411.67,4938.77 3411.68,4795.13 cw(c3387.56,4795.12) 3387.56,4771.01 ccw(c3387.56,4761.29) 3377.84,4761.29 3377.84,4573.72 ccw(c3398.51,4573.72) 3398.51,4553.05 3523.39,4553.05 ccw(c3523.39,4566.94) 3537.28,4566.94 3537.28,4594.53 cw(c3569.69,4594.53) 3569.69,4626.94 3697.5,4626.94 cw(c3697.5,4595.05) 3729.38,4595.05 ccw(c3757.49,4595.05) 3757.5,4566.94 3841.27,4566.94 ccw(c3841.27,4595.05) 3869.38,4595.05 cw(c3901.27,4595.05) 3901.27,4626.94 4059.28,4626.94 cw(c4059.28,4599.6) 4086.61,4599.6 4086.61,4598.71 ccw(c4118.38,4598.71) 4118.38,4566.94 4188.32,4566.94 ccw(c4188.32,4599.6) 4220.99,4599.6 cw(c4248.32,4599.6) 4248.32,4626.94 4389.5,4626.94 cw(c4389.51,4597.06) 4419.38,4597.06 ccw(c4449.5,4597.05) 4449.5,4566.94 4531.22,4566.94 ccw(c4531.22,4613.96) 4578.24,4613.96 4578.24,4718.45 cw(c4578.24,4768.01) 4528.68,4768.01 4528.68,5044.94 4528.68,5092.05 ccw(c4508.72,5092.05) 4508.72,5112.01 4390.64,5112.01 cw(c4390.64,5190.5) 4312.14,5190.5 4312.14,5289 cw(c4412.14,5289) 4412.14,5389 4429.58,5389 4429.58,5389.16 4505.79,5389.16 ccw(c4505.79,5487.16) 4603.79,5487.16 4603.79,6277.21 ccw(c4508.7,6277.21) 4508.7,6372.3 4321.09,6372.3 cw(c4321.09,6443.82) 4249.58,6443.82 4249.58,6649.05 3696.9,6649.05 3696.9,6443.82 cw(c3625.39,6443.82) 3625.39,6372.3 3442.69,6372.3 ccw(c3442.69,6272.3) 3342.69,6272.3 3342.69,5995.74 ccw(c3363.27,5995.74) 3363.27,5975.17 3505.38,5975.17 3765.87,5975.17 ccw(c3765.87,5996.68) 3787.38,5996.68 3787.38,6043.05 ccw(c3765,6043.05) 3764.99,6065.44 3620.35,6065.44 cw(c3620.35,6077.41) 3608.38,6077.41 3608.38,6116.95 cw(c3626.46,6116.95) 3626.46,6135.03 3872.74,6135.03 ccw(c3872.74,6156.67) 3894.38,6156.67 3894.38,6532.99 cw(c3923.44,6532.99) 3923.44,6562.05

## Other copper
Top Layer:
  rectangle net AGND: 3828.55,6411.83 3842.33,6549.98
  rectangle net AGND: 4395.21,5736.79 4420.21,5761.41
  rectangle net AGND: 4317.59,5736.79 4342.59,5761.41
  rectangle net AGND: 4216.29,5736.78 4241.29,5761.4
  region net AVSS: 4149.71,5046.37 4130.05,5074.46 4120.57,5067.82 4140.24,5039.74
  rectangle net AVSS: 4136.79,4924.53 4153.43,5055.07
  rectangle net AVSS: 3702.26,4974.67 3768.91,4998.68
  rectangle net AVSS: 3632.71,4956.64 3656.8,5128.79
  region net AVSS: 4223.43,5021.21 4138.49,5021.21 4138.49,5010.19 4223.43,5010.19
  region net AVSS: 4223.43,4981.84 4138.49,4981.84 4138.49,4970.82 4223.43,4970.82
  region net AVSS: 4223.43,4922.78 4138.49,4922.78 4138.49,4911.76 4223.43,4911.76
  rectangle net AVSS: 4165.55,5010.19 4321.09,5021.21
  rectangle net AVSS: 3719.1,5069.24 3804.03,5080.26
  rectangle net AVSS: 4165.55,5147.98 4260.35,5159
  rectangle net AGND: 4057.82,5710.22 4204.09,5727.93
  rectangle net BIAS_DRV_ELCT: 4356.58,4789.69 4390.97,4860.09
  rectangle net BIAS_DRV_ELCT: 4386.01,4750.93 4397.43,4866.24
  rectangle net AGND: 4339.17,4750.93 4378.16,4760.78
  rectangle net AGND: 4497.87,6135.49 4528.3,6145.33
  rectangle net AGND: 4057.82,5914.94 4238.47,5932.66
  rectangle net AGND: 4206.07,5912.38 4252.51,5936
  rectangle net DVDD: 3753.88,5200.15 3829.14,5299.55
  rectangle net AGND: 3719.1,4845.69 3776.97,4863.73
  rectangle net AVSS: 3719.1,4970.82 3776.97,5001.52
  rectangle net AVSS: 4323.38,5912.38 4357.22,6040.61
  rectangle net AGND: 4162.88,5876.57 4187.88,5923.8
  rectangle net -RAW: 4162.88,5812.58 4249.38,5857.57
  rectangle net -RAW: 4206.07,5773.78 4281.23,5898.6
  rectangle net AVDD: 4503.1,5917.38 4531.73,6119.04
  rectangle net VBATT: 3867.92,6311.05 3881.93,6474.89
  rectangle net AGND: 3600.58,5605.89 3664.89,5676.75
  region net NetC24_2: 3750.18,5676.75 3685.87,5676.75 3685.87,5605.89 3750.18,5605.89
  region net AGND: 3750.18,5849.97 3685.87,5849.97 3685.87,5779.11 3750.18,5779.11
  rectangle net NetC23_2: 3600.58,5779.11 3664.89,5849.97
  rectangle net DVDD: 4039.41,6152.85 4191.41,6214.32
  rectangle net DVDD: 4063.76,6190.7 4092.76,6271.73
  rectangle net AVDD: 4231.38,4892.08 4271.64,4962.15
  rectangle net AVDD: 4165.55,4892.08 4253.62,4903.1
  rectangle net AVDD: 4165.55,4931.45 4253.62,4962.15
  rectangle net NetC20_2: 3678.88,5029.87 3776.97,5040.89
  rectangle net NetC19_2: 3669.71,4872.39 3776.97,4903.1

## Silkscreen, mask and mechanical layers (free items; w line width, h text height)
Top Overlay:
  pour cut-out: 3736.7,-567.41 3728.67,-567.41 3728.67,-735.85 3894.26,-735.85 3894.26,-581.62 3857.93,-581.62 3857.93,-243.19 3736.7,-243.19
  lines w15: 3639.1,4636.82 3673.64,4709.04 3677.57,4709.04 3710.54,4637.6 ; 3734.47,4709.04 3769.01,4709.04 cw(c3769.01,4672.09) 3805.96,4672.09 3805.93,4670.58 cw(c3772.96,4670.58) 3772.96,4637.6 3767.44,4637.6 3736.43,4637.6 3736.43,4665.87 ; 3828.36,4649.38 ccw(c3841.7,4649.38) 3841.7,4636.03 ; 3860.93,4636.03 3876.64,4636.03 ccw(c3876.64,4650.95) 3891.55,4650.95 3891.55,4652.52 ccw(c3875.07,4652.52) 3875.07,4669.01 3850.34,4669.01 cw(c3850.34,4689.42) 3829.93,4689.42 cw(c3849.55,4689.42) 3849.55,4709.04 3864.07,4709.04 ; 3896.86,4709.04 3963.59,4709.04 ; 3930.23,4633.68 3930.23,4682.82 ; 3990.97,4709.04 4030.22,4709.04 cw(c4030.22,4687.06) 4052.21,4687.06 cw(c4032.58,4687.06) 4032.58,4667.44 ; 3993.33,4635.25 3993.33,4667.44 4027.08,4667.44 4032.58,4667.44 ; 4053.4,4634.28 4032.58,4667.44 ; 4079.68,4659.58 ccw(c4104.02,4659.58) 4104.02,4635.25 4111.48,4635.25 4116.97,4635.25 ; 4079.68,4660.37 4079.68,4678.82 ; 4079.68,4692.82 4079.68,4709.04 ; 4118.15,4635.25 ccw(c4118.15,4660.37) 4143.27,4660.37 ; 4143.27,4680.82 4143.27,4709.04 ; 4174.71,4634.46 4174.71,4708.26 4218.28,4657.23 4261.85,4708.26 4261.46,4634.46
  text "DVDD" at 4423.78,6231.19 h50
  text "AVSS" at 4424.36,6161.93 h50
  text "AVDD" at 4422.46,6094.76 h50
  text "PROGRAMMING" at 3518.66,5722.02 h50 r90
  text "BOOT" at 4473.38,5569.48 h50 r90
  text "Rev-v3.0" at 4585.23,5507.31 h35 r90
  text "MCLR" at 4472.77,5423.47 h50 r90
  text "MCLK" at 3695.13,5422.98 h50
  text "ELECTRODE # 8" at 229.79,1309.07 h100 r90
  text "ELECTRODE # 7" at 797.79,1309.07 h100 r90
  text "ELECTRODE # 6" at 1897.79,1309.07 h100 r90
  text "ELECTRODE # 3" at 6615.79,1309.07 h100 r90
  text "ELECTRODE # 2" at 7352.79,1309.07 h100 r90
  text "ELECTRODE # 1" at 8021.85,1309.07 h100 r90
  text "ELECTRODE # 4" at 5803.79,1307.24 h100 r90
  text "ELECTRODE # 5" at 3840.79,1306.3 h100 r90
  text "-REF" at 3845.38,-556.38 h180 r90
  text "V" at 3887.64,-731.19 h300 r90
Board Outline:
  drawing of 187 lines, arcs and shapes, not listed
Fabrication:
  drawing of 746 lines, arcs and shapes, not listed
  text "Layer" at 9406.58,7454 h60
  text "Name" at 9816.49,7454 h60
  text "Material" at 10746.23,7454 h60
  text "Thickness" at 11606,7454 h60
  text "Constant" at 12255.84,7454 h60
  text "Flex Layer Stack" at 12825.7,7454 h60
  text "Top Overlay" at 9816.49,7334 h60
  text "Top Solder" at 9816.49,7214 h60
  text "Solder Resist" at 10746.23,7214 h60
  text "0.013mm" at 11606,7214 h60
  text "3.5" at 12255.84,7214 h60
  text "1" at 9406.58,7094 h60
  text "Top Layer" at 9816.49,7094 h60
  text "0.035mm" at 11606,7094 h60
  text "Dielectric 1" at 9816.49,6974 h60
  text "Flex" at 10746.23,6974 h60
  text "0.020mm" at 11606,6974 h60
  text "4.8" at 12255.84,6974 h60
  text "2" at 9406.58,6854 h60
  text "Bottom Layer" at 9816.49,6854 h60
  text "0.035mm" at 11606,6854 h60
  text "Bottom Solder" at 9816.49,6734 h60
  text "Solder Resist" at 10746.23,6734 h60
  text "0.013mm" at 11606,6734 h60
  text "3.5" at 12255.84,6734 h60
  text "Bottom Overlay" at 9816.49,6614 h60
  text "Total board thickness:" at 9406.58,6494 h60
  text "0.116mm" at 11606,6494 h60
  text "Stiffener Area" at 1039.86,5993.66 h60
  text "Stiffener Area" at 3578.86,5928.66 h60
  text "Material : FR4" at 1037.51,5888.87 h60
  text "Material : FR4" at 3576.51,5823.87 h60
  text "Thickness : 0.20mm" at 931,5783 h60
  text "Thickness : 0.20mm" at 3470,5718 h60
  text "Stiffener Area" at 3567.58,4923.05 h60
  text "Stiffener Area" at 12861,4864 h60
  text "Thickness : 0.25mm" at 3446.58,4814.05 h60
  text "Thickness : 0.25mm" at 12740,4755 h60
  text "Material : Polyimide" at 3420.43,4700.21 h60
  text "Material : Polyimide" at 12713.86,4641.16 h60
  text "Material : Polyimide" at 203.63,1205.47 h60 r90
  text "Material : Polyimide" at 774.06,1205.47 h60 r90
  text "Material : Polyimide" at 1890.7,1205.47 h60 r90
  text "Material : Polyimide" at 3827.7,1205.47 h60 r90
  text "Material : Polyimide" at 5772.81,1205.47 h60 r90
  text "Material : Polyimide" at 6580.31,1205.47 h60 r90
  text "Material : Polyimide" at 7325.96,1205.47 h60 r90
  text "Material : Polyimide" at 7997.7,1205.47 h60 r90
  text "Cut-out" at 89.06,924.85 h30
  text "Cut-out" at 658.03,924.85 h30
  text "Cut-out" at 1757.82,924.85 h30
  text "Cut-out" at 3701.3,924.85 h30
  text "Cut-out" at 5663.47,924.85 h30
  text "Cut-out" at 6476.18,924.85 h30
  text "Cut-out" at 7212.93,924.85 h30
  text "Cut-out" at 7882.4,924.85 h30
  text "Cut-out" at 4477.44,909.71 h30
  text "FR4" at 155.24,465 h60 r90
  text "FR4" at 724.22,465 h60 r90
  text "FR4" at 1824,465 h60 r90
  text "FR4" at 3767.48,465 h60 r90
  text "FR4" at 5729.65,465 h60 r90
  text "FR4" at 6542.36,464.99 h60 r90
  text "FR4" at 7279.11,465 h60 r90
  text "FR4" at 7948.59,465 h60 r90
  text "Material" at 42.66,323 h60 r90
  text "Material" at 611.63,323 h60 r90
  text "Material" at 1711.42,323 h60 r90
  text "Material" at 3654.9,323 h60 r90
  text "Material" at 5617.07,323 h60 r90
  text "Material" at 6429.78,322.99 h60 r90
  text "Material" at 7166.53,323 h60 r90
  text "Material" at 7836,323 h60 r90
  text "Cut-out" at 105,131.8 h30
  text "Cut-out" at 673.98,131.8 h30
  text "Cut-out" at 1773.76,131.8 h30
  text "Cut-out" at 3717.24,131.8 h30
  text "Cut-out" at 5679.41,131.8 h30
  text "Cut-out" at 6492.12,131.8 h30
  text "Cut-out" at 7228.87,131.8 h30
  text "Cut-out" at 7898.35,131.8 h30
  text "Cut-out" at 4493.38,116.66 h30
  text "Stiffener Area" at 4951,-193 h60 r90
  text "Thickness : 0.20mm" at 5058,-193 h60 r90
  text "Material : FR4" at 5161.42,-193 h60 r90
  text "FR4" at 3774.62,-325.28 h60 r90
  text "Material" at 3662.04,-467.28 h60 r90
  text "Cut-out" at 85.2,-570.3 h30
  text "Cut-out" at 654.17,-570.29 h30
  text "Cut-out" at 1753.96,-570.3 h30
  text "Cut-out" at 5659.61,-570.29 h30
  text "Cut-out" at 6472.32,-570.3 h30
  text "Cut-out" at 7209.07,-570.29 h30
  text "Cut-out" at 7958.54,-570.3 h30
  text "Cut-out" at 3717.24,-656.61 h30
  text "Cut-out" at 4493.38,-671.75 h30
  text "Cut-out" at 101.14,-1363.34 h30
  text "Cut-out" at 670.12,-1363.34 h30
  text "Cut-out" at 1769.9,-1363.34 h30
  text "Cut-out" at 5675.55,-1363.34 h30
  text "Cut-out" at 6488.26,-1363.35 h30
  text "Cut-out" at 7225.01,-1363.34 h30
  text "Cut-out" at 7974.49,-1363.34 h30
  text "Stiffener Area" at 6924.08,-1364.89 h60 r90
  text "Material : FR4" at 7026.28,-1376.31 h60 r90
  text "Stiffener Area" at 5230.31,-1382 h60 r90
  text "Material : FR4" at 5332.5,-1382 h60 r90
  text "Stiffener Area" at 8410.31,-1382 h60 r90
  text "Material : FR4" at 8512.5,-1382 h60 r90
  text "Thickness : 0.20mm" at 8614,-1382 h60 r90
  text "Stiffener Area" at 7652.72,-1383.82 h60 r90
  text "Thickness : 0.20mm" at 5434,-1391.8 h60 r90
  text "Thickness : 0.20mm" at 6264.25,-1391.8 h60 r90
  text "Material : FR4" at 7754.91,-1395.24 h60 r90
  text "Stiffener Area" at -344,-1412 h60 r90
  text "Thickness : 0.20mm" at -237,-1412 h60 r90
  text "Material : FR4" at -133.58,-1412 h60 r90
  text "Stiffener Area" at 1118,-1412 h60 r90
  text "Thickness : 0.20mm" at 1225,-1412 h60 r90
  text "Material : FR4" at 1328.42,-1412 h60 r90
  text "Stiffener Area" at 2215,-1412 h60 r90
  text "Thickness : 0.20mm" at 2322,-1412 h60 r90
  text "Material : FR4" at 2425.42,-1412 h60 r90
Drill Drawing:
  circle w10: c19.43,8246.38 r33.33
  lines w10: -13.91,8063.04 52.76,8063.04 52.76,8129.71 -13.91,8129.71 -13.91,8063.04
  lines w15: -73.7,8018.04 10547.35,8018.04 ; -73.7,8318.04 10547.35,8318.04 ; 477.18,7868.04 477.18,8468.04 ; 1067.02,7868.04 1067.02,8468.04 ; 2156.7,7868.04 2156.7,8468.04 ; 2662.58,7868.04 2662.58,8468.04 ; 3396.38,7868.04 3396.38,8468.04 ; 4895.93,7868.04 4895.93,8468.04 ; 5485.78,7868.04 5485.78,8468.04 ; 6231.58,7868.04 6231.58,8468.04 ; 6981.37,7868.04 6981.37,8468.04 ; 7835.14,7868.04 7835.14,8468.04 ; 9168.74,7868.04 9168.74,8468.04 ; -73.7,7868.04 10547.35,7868.04 10547.35,8468.04 -73.7,8468.04 -73.7,7868.04
  text "Symbol" at 16.3,8363.04 h72
  text "Count" at 522.18,8363.04 h72
  text "Hole Size" at 1112.02,8363.04 h72
  text "Plated" at 2201.7,8363.04 h72
  text "Hole Type" at 2707.58,8363.04 h72
  text "Drill Layer Pair" at 3441.38,8363.04 h72
  text "Via/Pad" at 4940.93,8363.04 h72
  text "Pad Shape" at 5530.78,8363.04 h72
  text "Template" at 6276.58,8363.04 h72
  text "Description" at 7026.37,8363.04 h72
  text "Hole Tolerance (+)" at 7880.14,8363.04 h72
  text "Hole Tolerance (-)" at 9213.74,8363.04 h72
  text "16" at 522.18,8213.04 h60
  text "39.37mil (1.000mm)" at 1112.02,8213.04 h60
  text "NPTH" at 2201.7,8213.04 h60
  text "Round" at 2707.58,8213.04 h60
  text "Top Layer - Bottom Layer" at 3441.38,8213.04 h60
  text "Pad" at 4940.93,8213.04 h60
  text "Rounded" at 5530.78,8213.04 h60
  text "c0hn100" at 6276.58,8213.04 h60
  text "162" at 522.18,8063.04 h60
  text "11.81mil (0.300mm)" at 1112.02,8063.04 h60
  text "PTH" at 2201.7,8063.04 h60
  text "Round" at 2707.58,8063.04 h60
  text "Top Layer - Bottom Layer" at 3441.38,8063.04 h60
  text "Via" at 4940.93,8063.04 h60
  text "Rounded" at 5530.78,8063.04 h60
  text "v60h30m0mx0" at 6276.58,8063.04 h60
  text "178 Total" at 522.18,7913.04 h60

## Dimensions
3696.9,6649.05 to 3472.26,5388.05 on Dimension
3612.24,-788.41 to 3982.73,1069.27 on Dimension
370.49,1069.27 to 0,0 on Dimension
-99.28,672.03 to 8204.57,674.24 on Dimension
4249.58,6649.05 to 8039.21,-94.79 on Dimension